# Altium PCB MainBoardPCB_3.PcbDoc (part 11 of 36)
Units mm, origin at the board's own origin, x right, y up, seen from the top; angles counter-clockwise.
Board outline 258.95 x 308.86 mm, 16 copper layers (L1, L2 (GND), L3 (Sign), L4 (GND), L5 (Sign), L6 (PWR/GND), L7(PWR/GND), L8 (Plane_GND), L9 (PWR/GND), L10 (PWR/GND), L11 (PWR/GND), L12 (Sign), L13 (GND), L14 (Sign), L15 (GND), L16), stack 2.502 mm thick; 2402 components, 1749 nets, 8407 pads, 3409 vias.
Unrouted connection lines stored in the file: 4352.
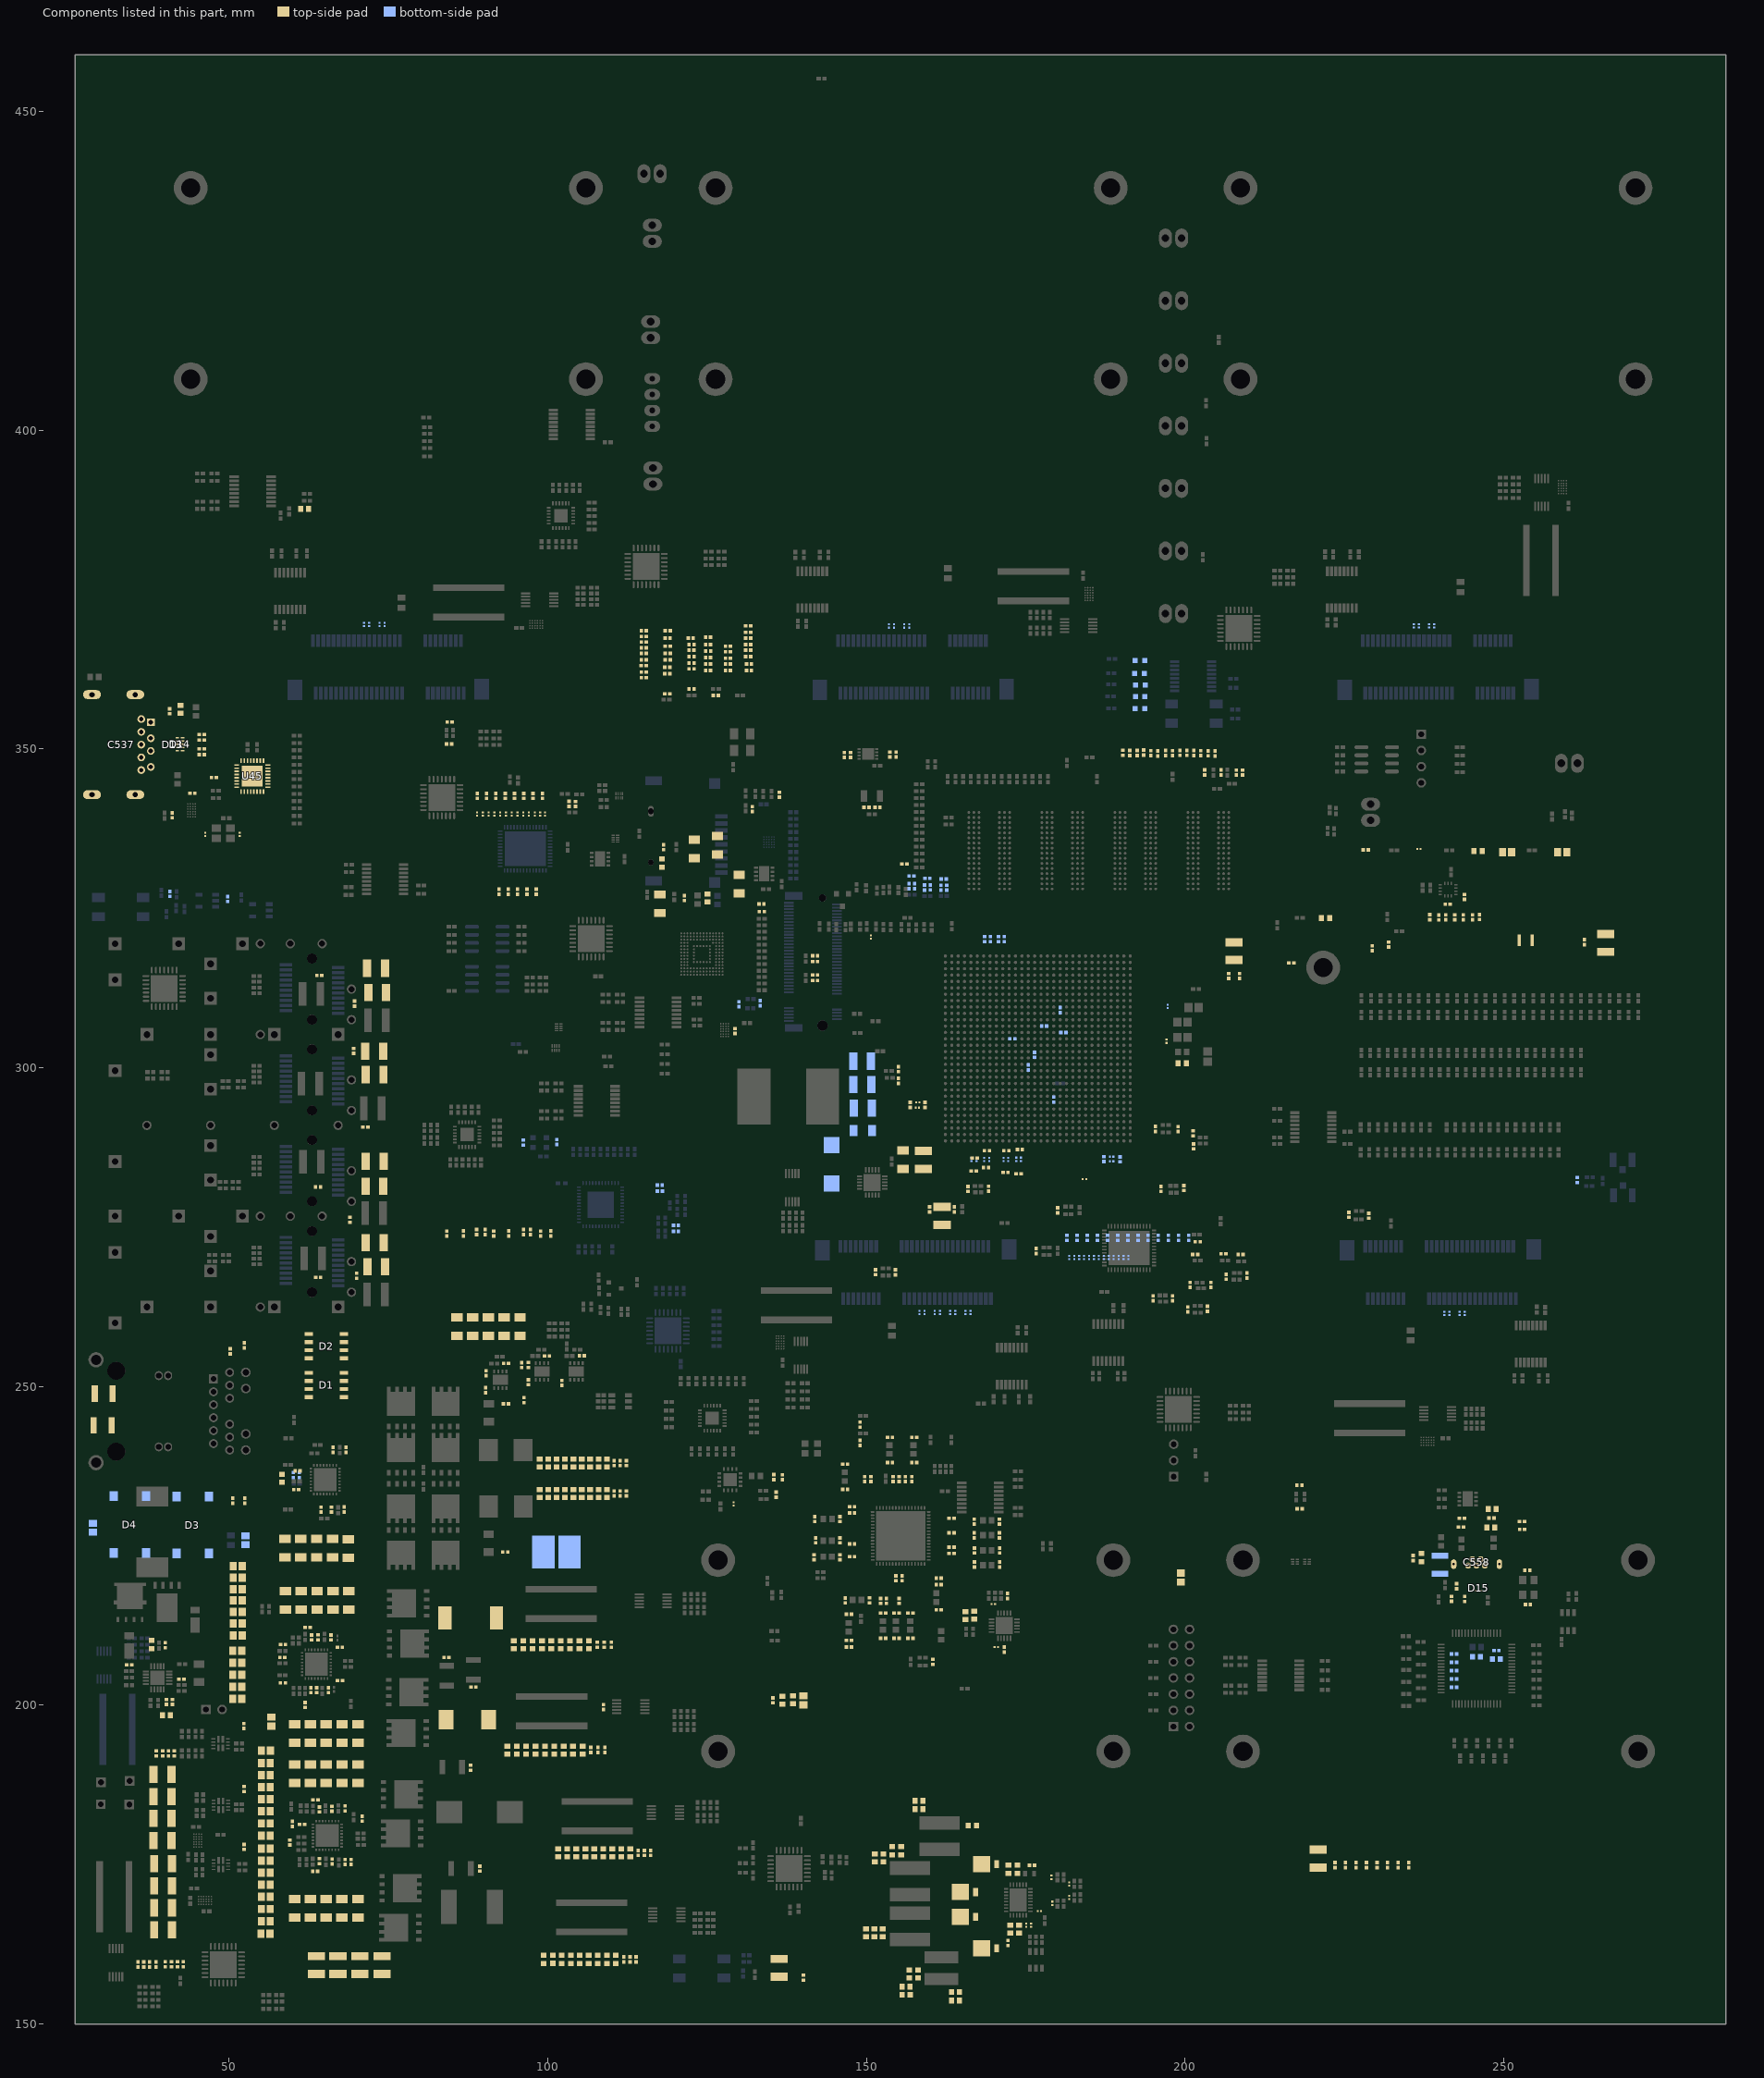
[diagram p19: the components of this part, seen from the top]

## Part data (continued)
D13 D15: "TVS DIODE 5.5V 8V SOT3", Breakdown Voltage=9V, Capacitance=0.8pF, Case/Package=SOT, Clamping Voltage=8V, Manufacturer="Texas Instruments", Max Operating Temperature=85°C, Min Operating Temperature=-40°C, Package Quantity=1, Peak Pulse Current=1A, Peak Pulse Power=45W, Power Line Protection=Yes, Reverse Standoff Voltage=5.5V, Supplier Part Number 1=296-25509-1-ND, Test Current=1mA, Category="Interface ICs", ComponentLink1Description=https://datasheet.ciiva.com/1611/tpd2eusb30-1611602.pdf?src-supplier=Newark, ComponentLink1URL=https://datasheet.ciiva.com/1611/tpd2eusb30-1611602.pdf?src-supplier=Newark, ComponentLink2Description=https://datasheet.ciiva.com/15134/getdatasheetpartid-202713-15134479.pdf?src-supplier=Verical, ComponentLink2URL=https://datasheet.ciiva.com/15134/getdatasheetpartid-202713-15134479.pdf?src-supplier=Verical, ComponentLink3Description=https://datasheet.ciiva.com/26787/tpd2eusb30drtr-26787652.pdf?src-supplier=IIIC, ComponentLink3URL=https://datasheet.ciiva.com/26787/tpd2eusb30drtr-26787652.pdf?src-supplier=IIIC, ComponentLink4Description=https://datasheet.ciiva.com/353/tpd2eusb30-353272.pdf?src-supplier=Digi-Key, ComponentLink4URL=https://datasheet.ciiva.com/353/tpd2eusb30-353272.pdf?src-supplier=Digi-Key, ComponentLink5Description=https://datasheet.ciiva.com/1504/1882087-1504248.pdf?src-supplier=Element14, ComponentLink5URL=https://datasheet.ciiva.com/1504/1882087-1504248.pdf?src-supplier=Element14, ComponentLink6Description=https://datasheet.ciiva.com/353/tpd2eusb30-353273.pdf?src-supplier=Digi-Key, ComponentLink6URL=https://datasheet.ciiva.com/353/tpd2eusb30-353273.pdf?src-supplier=Digi-Key, ComponentLink7Description=https://datasheet.ciiva.com/25956/tpd4eusb30-25956841.pdf?src-supplier=Avnet+Europe, ComponentLink7URL=https://datasheet.ciiva.com/25956/tpd4eusb30-25956841.pdf?src-supplier=Avnet+Europe, ComponentLink8Description=https://datasheet.ciiva.com/353/tpd2eusb30-353274.pdf?src-supplier=Digi-Key, ComponentLink8URL=https://datasheet.ciiva.com/353/tpd2eusb30-353274.pdf?src-supplier=Digi-Key, Depth=0.8mm, Direction=Unidirectional,Bidirectional, Element Configuration=Dual, ESD Protection=Yes, Height=0.45mm, Interface=USB, Lead Free="Lead Free", Length=1mm, Manufacturer Part Number=TPD2EUSB30DRTR, Min Breakdown Voltage=9V, Number of Bidirectional Channels=2, Number of Channels=2, Number of Pins=3, Packaging="Tape and Reel", Pricing 1="1=0,58000, 10=0,49400, 25=0,46160, 100=0,34280, 250=0,32564, 500=0,26764, 1000=0,21754 (USD)", Radiation Hardening=No, REACH SVHC="No SVHC", RoHS=Yes, Stock 1=293674, Supplier 1=Digi-Key, Width=0.85mm, Working Voltage=5.5V
D14: "TVS DIODE 5.5V 8V 10SON", Breakdown Voltage=7V, Capacitance=0.8pF, Clamping Voltage=8V, Current Rating=5A, Manufacturer="Texas Instruments", Max Operating Temperature=85°C, Min Operating Temperature=-40°C, Package Quantity=1, Peak Pulse Current=1A, Peak Pulse Power=45W, Power Line Protection=Yes, Reverse Standoff Voltage=5.5V, Supplier Part Number 1=296-28063-1-ND, Category="TVS Diodes", ComponentLink1Description=https://datasheet.ciiva.com/339/tpd4eusb30-339202.pdf?src-supplier=Digi-Key, ComponentLink1URL=https://datasheet.ciiva.com/339/tpd4eusb30-339202.pdf?src-supplier=Digi-Key, ComponentLink2Description=https://datasheet.ciiva.com/41659/1634000-41659268.pdf?src-supplier=Farnell, ComponentLink2URL=https://datasheet.ciiva.com/41659/1634000-41659268.pdf?src-supplier=Farnell, ComponentLink3Description=https://datasheet.ciiva.com/15134/getdatasheetpartid-299321-15134669.pdf?src-supplier=Verical, ComponentLink3URL=https://datasheet.ciiva.com/15134/getdatasheetpartid-299321-15134669.pdf?src-supplier=Verical, ComponentLink4Description=https://datasheet.ciiva.com/339/tpd4eusb30-339204.pdf?src-supplier=Digi-Key, ComponentLink4URL=https://datasheet.ciiva.com/339/tpd4eusb30-339204.pdf?src-supplier=Digi-Key, ComponentLink5Description=https://datasheet.ciiva.com/1504/1882087-1504249.pdf?src-supplier=Element14, ComponentLink5URL=https://datasheet.ciiva.com/1504/1882087-1504249.pdf?src-supplier=Element14, ComponentLink6Description=https://datasheet.ciiva.com/339/tpd4eusb30-339203.pdf?src-supplier=Digi-Key, ComponentLink6URL=https://datasheet.ciiva.com/339/tpd4eusb30-339203.pdf?src-supplier=Digi-Key, ComponentLink7Description=https://datasheet.ciiva.com/22621/1882087-22621482.pdf?src-supplier=Element14, ComponentLink7URL=https://datasheet.ciiva.com/22621/1882087-22621482.pdf?src-supplier=Element14, Data Rate=6Gbps, Depth=1mm, Direction=Unidirectional, ESD Protection=Yes, Height=0.5mm, Interface=USB, Lead Free="Lead Free", Length=2.5mm, Manufacturer Part Number=TPD4EUSB30DQAR, Min Breakdown Voltage=8V, Number of Bidirectional Channels=4, Number of Channels=4, Number of Pins=10, Packaging="Tape and Reel", Pricing 1="1=0,81000, 10=0,71400, 25=0,67040, 100=0,48670, 250=0,46936, 500=0,40664, 1000=0,34608 (USD)", Radiation Hardening=No, REACH SVHC="No SVHC", RoHS=Yes, Stock 1=69157, Supplier 1=Digi-Key, Termination=SMD/SMT, Width=1.1mm, Working Voltage=5.5V
D16 D17 D18 D19: library part MBRM140T1G, Supplier Part Number 1=MBRM140T3GOSCT-ND, Supplier 1=Digi-Key